# Altium PCB IOT_Speaker.PcbDoc (part 3 of 3)
Units mil, origin at the board's own origin, x right, y up, seen from the top; angles counter-clockwise.
Board outline 2439.53 x 2669.05 mil, 2 copper layers (Top Layer, Bottom Layer), stack 57 mil thick; 125 components, 73 nets, 403 pads, 148 vias.
Unrouted connection lines stored in the file: 20.
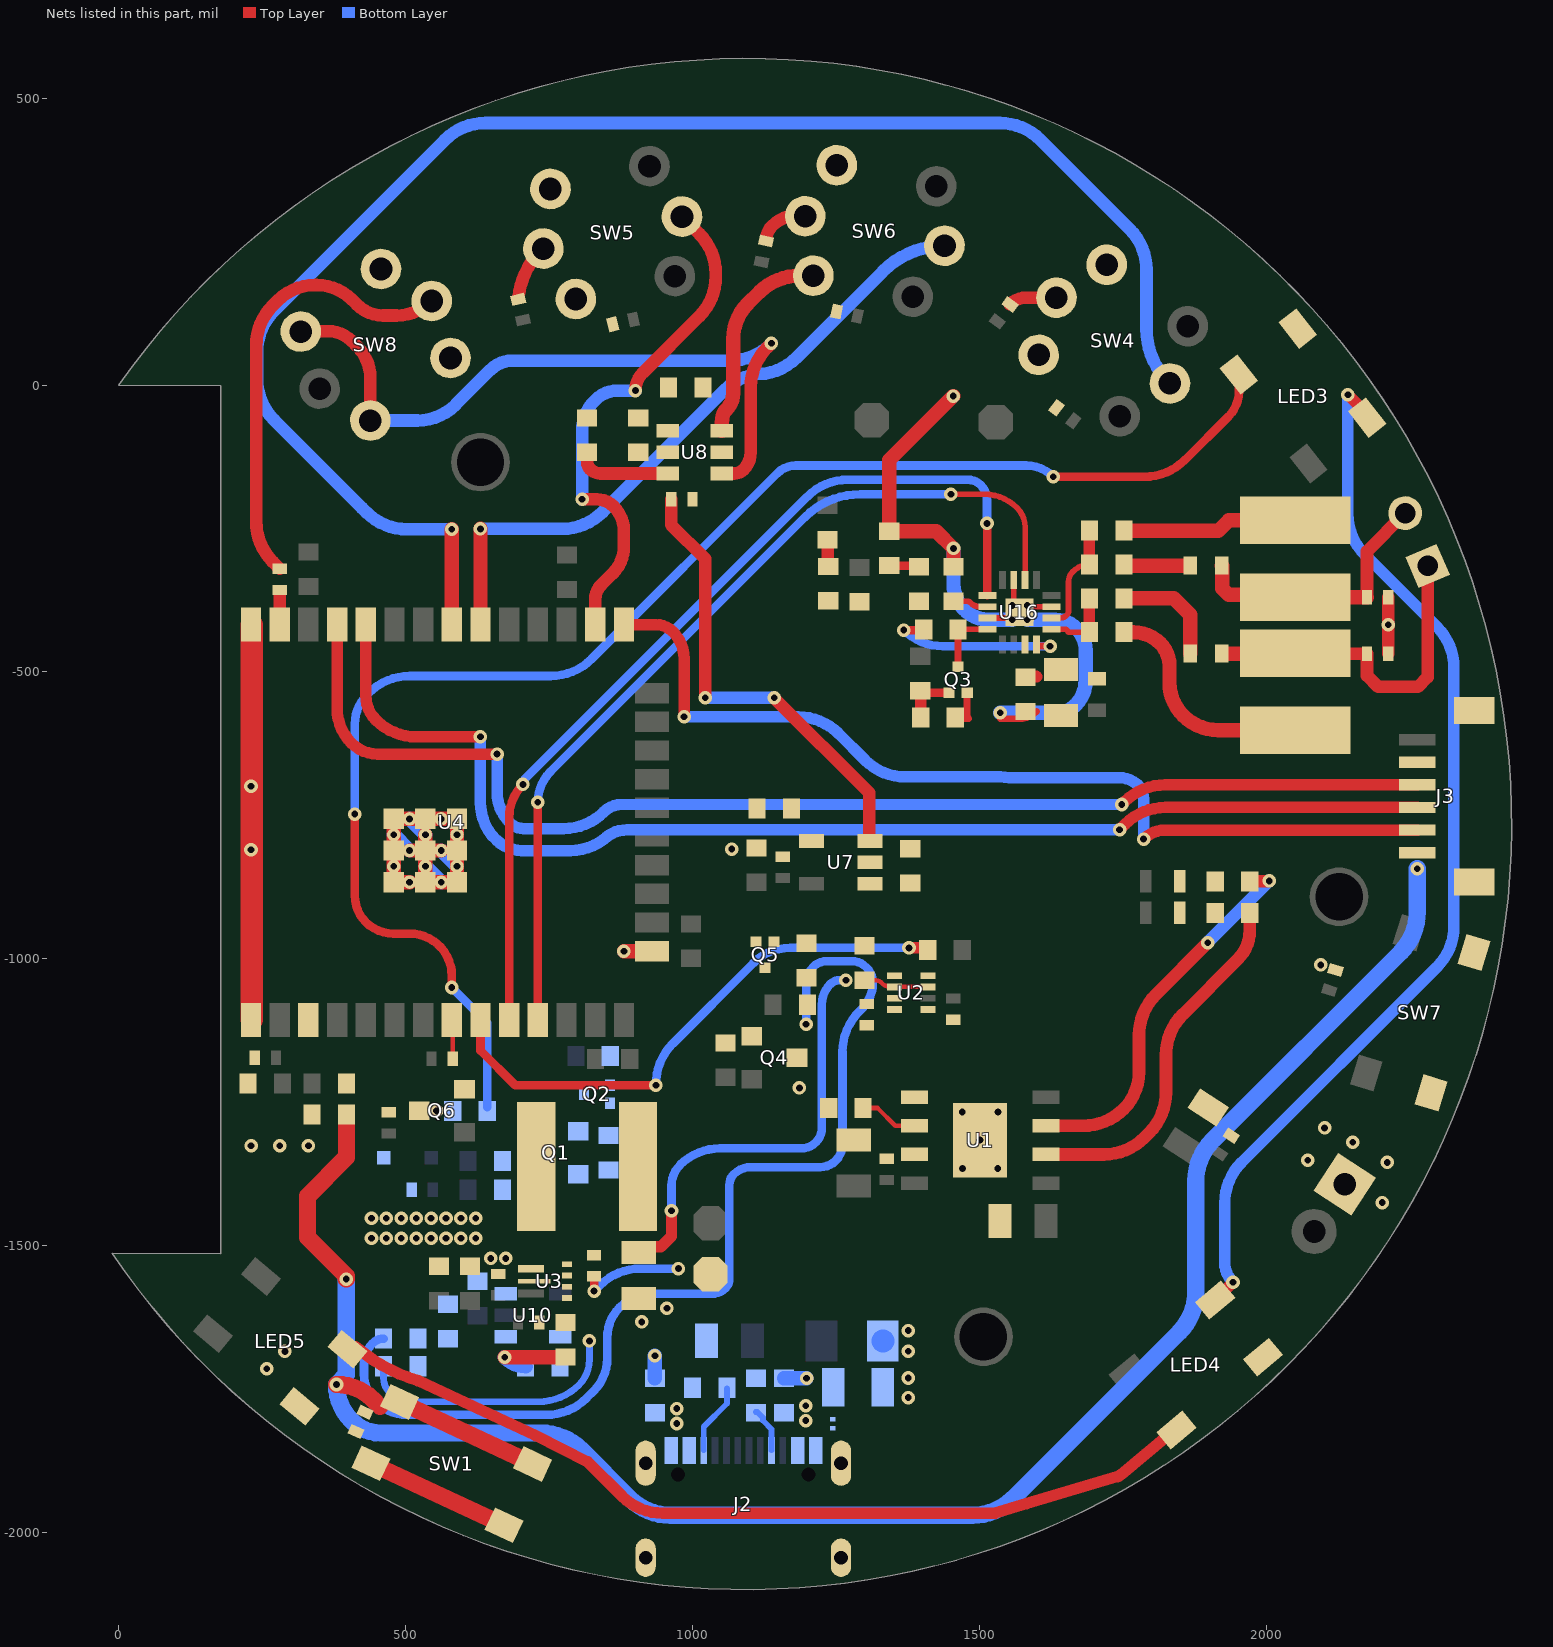
[diagram p2: the nets of this part, all layers, seen from the top]

## Via types
v1: diameter 23.62, hole 11.81, Top Layer to Bottom Layer, tented both sides, 129 vias
v2: diameter 23.62, hole 11.81, Top Layer to Bottom Layer, 19 vias

## Nets (pads, with @x,y where several pads share a name; then routed paths per layer and width w, separated by ;. In a path a pad name is that pad's centre, name@x,y a point inside that pad or via, vN(x,y) a via of type N, cw(c..) or ccw(c..) an arc to the next point about the centre after c; other vN are vias at no path point) (continued)
CHRG: R4.2 U1.7 | length 673.2
  Top Layer w22: U1.7@1615.79,-1291.05 1680.86,-1291.05 ccw(c1680.86,-1191.05) 1751.57,-1261.76 ccw(c1687.08,-1197.27) 1778.28,-1197.27 1778.28,-1133.14 cw(c1878.28,-1133.14) 1807.57,-1062.43 v1(1898,-972) ; R4.2@1969.74,-864.59 v1@2005.08,-864.59
  Bottom Layer w22: v1(1898,-972) 1898,-971.68 2005.08,-864.6 v1(2005.08,-864.28)
DATA_IN: U4.10 U16.1 | length 1631.5
  Top Layer w15: U4.10@680.31,-1106.5 680.31,-753.91 cw(c762.14,-753.91) 698.75,-702.16 cw(c762.14,-753.91) v1(704.28,-696.05) ; v1(1513.28,-241.05) 1513.53,-241.29 1513.53,-366.26 U16.1@1513.77,-366.51
  Bottom Layer w15: v1(704.28,-696.05) cw(c718.76,-696.05) 708.51,-685.81 1200.09,-194.24 cw(c1270.8,-264.95) 1270.8,-164.95 1480.31,-164.95 cw(c1480.31,-196.01) 1502.28,-174.05 cw(c1475.72,-200.6) 1513.28,-200.6 v1(1513.28,-241.05)
DETECTION: R6.2 U2.8 U4.9 | length 974.9
  Top Layer w15: U4.9@630.34,-1106.54 630.34,-1160.06 690.76,-1220.49 v1(936.11,-1220.49)
  Top Layer w20: v1(1377.28,-981.05) 1409.72,-981.05 R6.2@1410.03,-980.74
  Bottom Layer w15: v1(936.11,-1220.49) 936.11,-1218.73 cw(c1036.11,-1218.73) 965.4,-1148.01 1106.07,-1007.34 cw(c1170.31,-1071.58) 1170.31,-980.74 1376.97,-980.74 v1(1377.28,-981.05)
DIN: Q6.2 R26.2 U4.8 | length 80.1
  Top Layer w8: U4.8@580.34,-1106.53 581.84,-1108.03 R26.2@581.84,-1174.19
  Top Layer w15: U4.8@580.34,-1106.53 U4.8@580.34,-1094.72
DIN#: LED3.4 R28.2 | length 2638.4
  Top Layer w15: v1(411.28,-747.79) 411.28,-890.02 ccw(c476.36,-890.02) 430.34,-936.05 ccw(c478.63,-887.76) 478.63,-956.05 506.72,-956.05 cw(c506.72,-1029.67) 580.34,-1029.67 v1(580.34,-1050.05) ; v1(1628.83,-159.71) 1787.54,-159.71 ccw(c1787.54,-59.71) 1858.25,-130.42 1934.49,-54.18 ccw(c1891.03,-10.72) 1952.49,-10.72 LED3.4@1952.49,18.52
  Bottom Layer w15: v1(411.28,-747.79) 411.28,-590.75 cw(c482.98,-590.75) 432.28,-540.05 435.99,-536.34 cw(c506.7,-607.05) 506.7,-507.05 752.86,-507.05 ccw(c752.86,-407.05) 823.57,-477.76 1147.99,-153.34 cw(c1179.91,-185.26) 1179.91,-140.12 1581.52,-140.12 cw(c1581.52,-207.02) v1(1628.83,-159.71) ; v1(580.34,-1050.05) 642.07,-1111.78 R28.2@642.07,-1258.96
DOUT1: LED3.2 LED4.4 | length 1880.4
  Top Layer w20: LED4.4@1909.13,-1593.23 cw(c1838.53,-1664.05) 1909.24,-1593.34 LED4.4@1910.92,-1595.02 v1@1941.05,-1564.89 ; v1(2142.37,-16.87) 2171.78,-46.28 cw(c2161.45,-56.61) LED3.2@2176.06,-56.61 LED3.2@2180.68,-61.23
  Bottom Layer w20: v1(1942.04,-1563.84) cw(c1976.72,-1529.17) 1927.68,-1529.17 1927.68,-1425.72 cw(c2027.68,-1425.72) 1956.97,-1355.01 2297.96,-1014.01 ccw(c2227.25,-943.3) 2327.25,-943.3 2327.25,-492.41 ccw(c2227.25,-492.41) 2297.96,-421.7 2171.66,-295.39 cw(c2242.37,-224.68) 2142.37,-224.68 v1(2142.37,-16.87)
DOUT2: LED4.2 LED5.4 | length 1584
  Top Layer w20: LED5.4@414.58,-1691.68 LED5.4@398.43,-1680.55 412.35,-1676.4 441.59,-1698.08 441.76,-1698.22 ccw(c609.74,-1441.15) 521.01,-1735.14 522.3,-1735.74 726.64,-1831.03 817.28,-1877.05 877.27,-1937.04 ccw(c947.98,-1866.32) 947.98,-1966.32 1527.25,-1966.32 1582.11,-1949.94 1740.04,-1902.76 ccw(c1734.36,-1883.58) 1747.22,-1898.9 1789.9,-1863.09 1827.16,-1831.82 LED4.2@1843.64,-1821.08
EN: R13.2 R15.1 R16.1 | length 1829.1
  Bottom Layer w15: R13.2@461.16,-1662.26 ccw(c461.16,-1688.52) 442.59,-1669.95 ccw(c479.54,-1706.91) 427.28,-1706.91 427.28,-1723.79 ccw(c495.56,-1723.79) 447.28,-1772.08 ccw(c502.74,-1716.62) 502.74,-1795.05 744.62,-1795.05 ccw(c744.62,-1695.05) 815.33,-1765.76 827.78,-1753.31 ccw(c771.05,-1696.58) 851.28,-1696.58 851.28,-1660.38 cw(c926.39,-1660.38) 873.28,-1607.26 cw(c929.76,-1663.74) 929.76,-1583.87 1033.74,-1583.87 ccw(c1033.74,-1550.34) 1057.45,-1574.05 ccw(c1040.97,-1557.56) 1064.28,-1557.56 1064.28,-1393.81 cw(c1089.94,-1393.81) 1071.79,-1375.67 ; 1071.79,-1375.66 cw(c1102.26,-1406.13) 1071.85,-1375.61 cw(c1102.26,-1406.13) 1102.26,-1363.05 1222.72,-1363.05 ccw(c1222.72,-1325.49) 1249.28,-1352.05 ccw(c1220.31,-1323.08) 1261.28,-1323.08 1261.28,-1162.47 cw(c1361.28,-1162.47) 1290.57,-1091.76 1295.89,-1086.43 ccw(c1251.51,-1042.05) 1314.28,-1042.05 ccw(c1275.65,-1042.05) 1302.96,-1014.73 ccw(c1277.17,-1040.53) 1277.17,-1004.05 1234.42,-1004.05 ccw(c1234.42,-1038.19) 1210.28,-1014.05 ccw(c1240.23,-1043.99) 1197.87,-1043.99 v1(1197.87,-1114)
ENA: C14.2 C15.2 J3.6 R18.1 SW1.3 SW1.4 U4.3 | length 3543.6
  Top Layer w20: U4.3@330.34,-1106.53 U4.3@330.71,-1106.16
  Top Layer w30: v1@379.33,-1742.05 cw(c379.28,-1832.54) 443.27,-1768.55 455.14,-1780.43 ; v1(396.28,-1558.24) 396.28,-1553.05 329,-1485.77 329,-1413.66 396.5,-1346.16 C14.2@396.5,-1271.55 ; SW1.4@488.16,-1771.34 SW1.4@489.27,-1772.45 SW1.3@721.2,-1880.6
  Bottom Layer w30: v1(396.28,-1558.24) 396.28,-1725.05 v1(379.28,-1742.05) ccw(c467.99,-1742.05) 405.26,-1804.77 406.65,-1806.16 ccw(c456.12,-1756.64) 456.12,-1826.64 735.17,-1826.64 cw(c735.17,-1926.64) 805.88,-1855.93 890.71,-1940.76 ccw(c961.42,-1870.05) 961.42,-1970.05 1487.86,-1970.05 ccw(c1487.86,-1870.05) 1558.57,-1940.76 1847.99,-1651.34 ccw(c1777.28,-1580.63) 1877.28,-1580.63 1877.28,-1387.14 cw(c1977.28,-1387.14) 1906.57,-1316.43 2233.99,-989.01 ccw(c2163.28,-918.3) 2263.28,-918.3 v1(2263.28,-843.05)
ENABLE: C9.2 C16.2 C18.2 C74.2 C75.2 L1.1 R10.2 R14.2 U2.2 U2.7 U3.5 U3.7 U7.1 U7.3 U8.6 | length 2324.1
  Top Layer w8: C74.2@1299.61,-1037.4 1317.17,-1037.4 cw(c1317.17,-1057.12) 1331.11,-1043.17 ccw(c1345.37,-1028.92) 1345.37,-1049.08 U2.2@1352.14,-1049.08 U2.7@1410.41,-1049.08
  Top Layer w20: C16.2@906.87,-1512.64 C16.2@906.28,-1512.05 916.28,-1502.05 944.78,-1502.05 963.28,-1483.55 v1(963.28,-1439.05)
  Top Layer w22: R10.2@816.28,-117.05 816.28,-134.19 ccw(c833.35,-134.19) 821.28,-146.26 ccw(c840.08,-127.46) 840.08,-154.05 U8.6@956.63,-154.05 ; C9.2@962.78,-199.05 962.78,-243.55 1022.28,-303.05 v1(1022.28,-545.05) ; v1(1142.28,-545.05) 1308.28,-711.05 1308.28,-793.83 1308.65,-793.83 U7.3@1309.46,-794.65 ; C75.2@1379.46,-868.05 ccw(c1382.84,-864.66) C75.2@1382.84,-869.45
  Bottom Layer w12: R14.2@461.16,-1710.32 461.16,-1730.61 ccw(c495.72,-1730.61) 471.28,-1755.05 ccw(c512.39,-1713.94) 512.39,-1772.08 731.27,-1772.08 ccw(c731.27,-1672.08) 801.98,-1742.79 ccw(c757.81,-1698.61) 820.28,-1698.61 v1(820.28,-1666.05)
  Bottom Layer w15: v1(963.28,-1439.05) 963.28,-1395.51 cw(c1014.49,-1395.51) 978.28,-1359.3 cw(c1047.68,-1428.69) 1047.68,-1330.55 1189.33,-1330.55 ccw(c1189.33,-1294.56) 1214.78,-1320.01 ccw(c1189.33,-1294.56) 1225.32,-1294.56 1225.32,-1079.97 cw(c1276.2,-1079.97) 1225.33,-1079.35 cw(c1276.2,-1079.97) 1240.23,-1043.99 cw(c1256.15,-1059.92) 1256.15,-1037.4 v1(1267.28,-1037.4)
  Bottom Layer w22: v1(1022.28,-545.05) v1(1142.28,-545.05)
GAIN: SB1.1 SB3.1 SB12.1 SB13.1 U16.2 | length 71.3
  Top Layer w10: SB3.1@1454.88,-376.65 1478.48,-376.65 cw(c1478.48,-384.84) 1484.28,-379.05 1485.4,-380.17 ccw(c1499.95,-365.61) 1499.95,-386.2 U16.2@1513.77,-386.2
  Top Layer w15: SB13.1@1230.88,-377.65 cw(c1233.29,-380.06) SB13.1@1233.29,-376.65
  Top Layer w20: SB13.1@1236.5,-376.02 ccw(c1240.43,-372.09) SB13.1@1240.43,-377.65 ; SB12.1@1290.88,-377.65 cw(c1293.29,-380.06) SB12.1@1293.29,-376.65
GND: C1.1 C2.1 C3.1 C4.2 C5.1 C6.1 C7.1 C8.1 C9.1 C10.1 C11.1 C12.2 C13.1 C14.1 C15.1 C16.1 C17.1 C18.1 C19.2 C20.1 C21.2 C22.2 C23.1 C24.2 C25.1 C26.1 C74.1 C75.1 C76.1 C77.1 C78.1 C81.1 C82.1 C83.1 C84.1 C102.1 C103.1 D1.2 D2.1 J1.1 J2.A1/B12 J2.B1/A12 J2.S1 J2.S2 J2.S3 J2.S4 J3.2 J3.MP1 J3.MP2 LED3.3 LED4.3 LED5.3 P3.1 Q2.2 Q3.2 Q5.2 R1.1 R2.1 R5.1 R8.1 R12.2 R54.1 R66.2 SB3.2 SW1.1 SW1.2 SW4.3 SW4.4 SW5.3 SW5.4 SW6.3 SW6.4 SW7.3 SW7.4 SW8.1 SW8.2 U1.1 U1.3 U1.9 U2.1 U2.4 U2.5 U3.1 U3.6 U4.1 U4.15 U4.38 U4.39 U4.39_16 U4.40 U4.41 U4.42 U4.43 U4.44 U4.45 U4.46 U4.47 U7.2 U8.2 U8.3 U10.3 U16.3 U16.11 U16.15 U16.17 | length 3842.6
  Top Layer w8: v1@828.28,-1579.2 v1(828.41,-1579.33)
  Top Layer w10: U16.3@1513.77,-405.88 U16.17@1557.28,-405.88 ; U16.17@1560.03,-372.28 U16.15@1560.03,-339.94 ; U16.17@1593.64,-386.2 U16.11@1625.98,-386.2
  Top Layer w12: R12.2@1457.88,-581.65 1481.28,-581.65 cw(c1487.68,-575.24) 1478.62,-575.24 Q3.2@1478.62,-536.28 ; v1@1536.28,-581.65 1568.49,-581.65 ccw(c1568.49,-537.26) 1599.88,-568.65 ; U16.17@1555.28,-384.05 cw(c1555.28,-390.34) 1559.72,-385.88 U16.17@1569.88,-396.04
  Top Layer w15: v1@828.28,-1579.2 C18.1@828.28,-1553.55
  Top Layer w22: C10.1@2212.68,-468.05 2212.68,-419.25 2213.86,-418.08 2213.86,-417.2 2212.68,-416.02 C11.1@2212.68,-369.65
  Top Layer w25: U4.39_16@506.72,-866.38 U4.39@479.16,-866.38 U4.40@479.16,-811.26 U4.41@479.16,-756.14 U4.44@534.28,-756.14 U4.39_16@561.84,-756.14 U4.47@589.4,-756.14 U4.39_16@589.4,-783.7 U4.46@589.4,-811.26 U4.39_16@589.4,-838.82 U4.45@589.4,-866.38 U4.39_16@561.84,-866.38 U4.42@534.28,-866.38 U4.39_16@534.28,-838.82 U4.43@534.28,-811.26 ; U4.39_16@506.72,-811.26 U4.43@534.28,-811.26 ; U4.39_16@534.28,-783.7 U4.43@534.28,-811.26 ; U4.39_16@561.84,-811.26 U4.43@534.28,-811.26 ; v1(672.78,-1694.72) R8.1@777.6,-1694.72 ; v1(880.34,-986.85) U4.15@929.55,-986.85 ; U8.3@1051.12,-79.24 1051.12,-64.51 cw(c1076.12,-64.58) 1051.49,-60.3 ccw(c1033.28,-57.05) 1051.74,-58.27 cw(c1076.67,-60.07) 1056.28,-45.61 cw(c1079.02,-61.78) 1059.29,-42.05 ccw(c1031.5,-14.25) 1070.81,-14.25 1070.81,80.49 cw(c1158.12,80.49) 1096.38,142.23 1115.7,161.55 cw(c1186.41,90.84) 1186.41,190.84 SW6.4@1210.69,190.84 ; v1(1454.28,-19.05) 1342.88,-130.45 R66.2@1342.88,-254.65 1424.88,-254.65 v1(1454.88,-284.65) SB3.2@1454.88,-316.65
  Top Layer w30: SW1.1@439.36,-1879.49 SW1.2@671.29,-1987.64
  Top Layer w39.37: U4.1@231.28,-1106.53 U4.38@231.28,-417.56
  Bottom Layer w15: v1(828.41,-1579.33) 838.4,-1569.34 cw(c909.11,-1640.05) 909.11,-1540.05 v1(975.28,-1540.05)
  Bottom Layer w25: U4.39_16@479.16,-783.7 U4.39_16@506.72,-811.26 ; U4.39_16@506.72,-756.14 U4.39_16@534.28,-783.7 ; U4.39_16@534.28,-838.82 U4.39_16@561.84,-866.38 ; U4.39_16@561.84,-811.26 U4.39_16@589.4,-838.82 ; v1(672.78,-1694.72) 673.79,-1695.74 ccw(c709,-1660.52) C82.1@709,-1710.32 ; C4.2@934.28,-1731.32 v1(934.28,-1692.05) ; C12.2@1159.28,-1731.32 v1(1198.66,-1731.32) ; v1(1454.88,-284.65) 1454.88,-346.46 ccw(c1517.53,-346.46) 1514.73,-409.05 v1(1557.28,-409.05) ; v1(1536.28,-571.05) 1635.89,-571.05 ccw(c1635.89,-526.66) 1667.28,-558.05 ccw(c1623.82,-514.59) 1685.28,-514.59 1685.28,-461.89 ccw(c1632.55,-461.89) 1669.83,-424.6 ccw(c1632.28,-462.16) 1632.28,-409.05 v1(1583.28,-409.05)
  other v1: 257.6,-1714.61 289.46,-1684.45 911.28,-1633.05 955.28,-1609.18 2202.28,-1425.05 1470.55,-1365.39 1531.99,-1365.39 2210.8,-1354.88 2072.56,-1351.15 230.34,-1326.05 280.34,-1326.05 330.34,-1326.05 2150.8,-1319.88 1501.28,-1316.05 2101.8,-1294.88 1470.28,-1267.05 1532.28,-1267.05 2095.19,-1010.75 230.28,-810.05 1068.17,-808.81 230.28,-699.05 2212.86,-417.64 1557.28,-384.05 1583.28,-384.05
  other v2: 648.16,-1522.29 674.16,-1522.29 440.31,-1487.29 466.16,-1487.29 492.16,-1487.29 518.16,-1487.29 544.16,-1487.29 570.16,-1487.29 596.16,-1487.29 622.16,-1487.29 440.31,-1452.29 466.16,-1452.29 492.16,-1452.29 518.16,-1452.29 544.16,-1452.29 570.16,-1452.29 596.16,-1452.29 622.16,-1452.29
IO0: J3.5 U4.25 | length 1652.1
  Top Layer w20: U4.25@880.34,-417.56 935.83,-417.56 cw(c935.83,-460.01) 965.85,-429.99 cw(c918.93,-476.91) 985.28,-476.91 v1(985.28,-578.05) ; v1(1786.15,-791.39) cw(c1824.45,-829.68) 1786.3,-791.25 cw(c1824.45,-829.68) 1824.45,-775.53 J3.5@2263.28,-775.53
  Bottom Layer w20: v1(985.28,-578.05) 1183.68,-578.05 cw(c1183.68,-678.05) 1254.39,-607.34 1300.81,-653.76 ccw(c1371.52,-583.05) 1371.52,-683.05 1536.57,-683.05 cw(c1536.57,-783.05) 1552.44,-684.31 1743.34,-684.31 cw(c1743.34,-733.24) 1773.36,-694.61 cw(c1743.34,-733.24) 1777.93,-698.64 ; 1776.06,-696.87 cw(c1751.71,-721.23) 1786.15,-721.23 v1(1786.15,-791.39)
LED1: SW4.5 U4.31 | length 2739.3
  Top Layer w25: U4.31@580.1,-417.31 v1(580.1,-251.24)
  Bottom Layer w22: v1(580.1,-251.24) 502.36,-251.24 cw(c502.36,-151.24) 431.65,-221.95 423.78,-214.08 270.29,-60.58 cw(c341,10.13) 241,10.13 241,58.85 cw(c341,58.85) 270.29,129.56 568.39,427.66 cw(c639.1,356.95) 639.1,456.95 1535.46,456.95 cw(c1535.46,356.95) 1606.17,427.66 1761.99,271.85 cw(c1691.28,201.13) 1791.28,201.13 1791.28,98.59 ; 1791.28,98.14 ccw(c1922.32,98.11) 1829.74,5.36 SW4.5@1832.16,2.95
LED2: SW6.5 U4.30 | length 1161.3
  Top Layer w25: v1(630.28,-250.55) 630.28,-417.5 U4.30@630.34,-417.56
  Bottom Layer w22: v1(630.28,-250.55) 772.3,-250.55 ccw(c772.3,-150.55) 843.01,-221.26 1055.12,-9.15 cw(c1125.83,-79.86) 1110.45,18.95 cw(c1125.83,-79.86) 1125.83,20.14 1126.23,20.14 ccw(c1110.86,118.95) 1181.57,48.24 1331.73,198.4 cw(c1439.1,91.14) SW6.5@1439.1,242.91
LED3: SW5.5 U4.26 | length 914.8
  Top Layer w22: v1(807.4,-199.05) 832.45,-199.05 cw(c832.45,-241.72) 862.62,-211.55 cw(c819.85,-254.32) 880.34,-254.32 880.34,-281.05 cw(c813.43,-281.05) 874.56,-308.25 cw(c813.43,-281.05) 860.74,-328.36 840.43,-348.68 ccw(c864.8,-373.04) 830.34,-373.04 U4.26@830.34,-417.56 ; v1(900.31,-9.45) cw(c944.06,-9.45) 913.12,21.49 1011.99,120.36 ccw(c943.46,188.89) 1040.37,188.89 1040.37,194.92 ccw(c943.46,194.92) 1011.99,263.45 SW5.5@981.55,293.88
  Bottom Layer w22: v1(807.4,-199.05) 807.4,-81.17 cw(c885.36,-81.17) 830.24,-26.05 cw(c870.31,-66.12) 870.31,-9.45 v1(900.31,-9.45)
LED4: R33.2 U4.37 | length 56.4
  Top Layer w22: U4.37@280.31,-417.53 R33.2@280.31,-361.22
LRCLK: U4.11 U16.14 | length 1582.7
  Top Layer w10: v1(1450.37,-190.26) 1508.45,-190.26 cw(c1508.45,-271.56) 1565.94,-214.07 cw(c1532.67,-247.34) 1579.72,-247.34 U16.14@1579.72,-339.94
  Top Layer w15: U4.11@730.31,-1106.5 v1(730.28,-727.05)
  Bottom Layer w15: v1(730.28,-727.05) cw(c805.73,-727.05) 752.38,-673.69 1196.05,-230.02 ; 1196.05,-230.02 cw(c1292.04,-326) 1292.04,-190.26 v1(1450.37,-190.26)
NetC10_2: C10.2 FB2.2 J9.1 L2.2 | length 606.3
  Top Layer w22: L2.2@2050.68,-467.65 2051.08,-468.05 C10.2@2175.68,-468.05 2175.68,-506.45 2195.28,-526.05 2264.29,-526.05 2281.35,-508.98 J9.1@2281.35,-315.1
  Top Layer w25: FB2.2@1922.84,-468.05 2050.28,-468.05 L2.2@2050.68,-467.65
NetC11_2: C11.2 FB3.2 J9.2 L3.2 | length 472.9
  Top Layer w22: C11.2@2175.68,-369.65 2175.68,-289.65 J9.2@2242.28,-223.05
  Top Layer w25: FB3.2@1922.68,-314.65 1923.37,-315.33 1923.37,-354.52 1934.49,-365.65 2046.68,-365.65 L3.2@2050.68,-369.65 C11.2@2175.68,-369.65
NetC76_2: C76.2 U7.4
NetC82_2: C82.2 U10.5
NetC84_2: C84.2 R13.1 R14.1 U10.1
NetC102_2: C102.2 C103.2 FB1.2 R65.2 U16.7 U16.8 | length 323.6
  Top Layer w12: R65.2@1401.48,-427.05 R65.2@1402.88,-425.65 ; U16.8@1599.4,-452.14 ccw(c1606.42,-445.13) 1606.42,-455.05 v1(1623.28,-455.05)
  Top Layer w15: v1(1368.28,-427.05) R65.2@1401.48,-427.05
  Top Layer w20: 1599.4,-507.5 ccw(c1601.02,-507.5) 1599.88,-508.65
  Bottom Layer w15: v1(1368.28,-427.05) ccw(c1435.88,-359.45) 1435.88,-455.05 v1(1623.28,-455.05)
NetF1_2: F1.2 FB7.1 | length 0.3
  Bottom Layer w40: FB7.1@1331.59,-1666.05 FB7.1@1331.82,-1666.28
  other v1: 1376,-1764.8 1376,-1730.76 1376,-1684.04 1376,-1648
NetFB2_1: FB2.1 SB5.2 | length 195.3
  Top Layer w25: SB5.2@1751.88,-371.65 1838.84,-371.65 1867.56,-400.36 1867.56,-467.89 FB2.1@1867.72,-468.05
NetFB3_1: FB3.1 SB7.2 | length 111.7
  Top Layer w25: SB7.2@1751.88,-314.65 FB3.1@1863.62,-314.65
NetJ2_A5: J2.A5 R1.2 | length 79.7
  Bottom Layer w10: R1.2@1110.28,-1790.05 1112.78,-1790.05 1122.78,-1800.05 1122.78,-1805.05 1137.71,-1819.98 J2.A5@1137.71,-1856.92
NetJ2_B5: J2.B5 R2.2 | length 124.7
  Bottom Layer w10: J2.B5@1019.6,-1856.92 1019.6,-1815.72 1060.1,-1775.22 R2.2@1060.1,-1749.05
NetL1_2: L1.2 U3.2
NetL2_1: L2.1 SB6.2 | length 407.5
  Top Layer w25: SB6.2@1751.88,-430.65 1768.44,-430.65 cw(c1768.44,-496.89) 1815.28,-450.05 cw(c1776.64,-488.69) 1831.28,-488.69 1831.28,-518.19 ccw(c1913.1,-518.19) 1855.25,-576.05 ccw(c1916.7,-514.59) 1916.7,-601.5 L2.1@2050.68,-601.5
NetL3_1: L3.1 SB8.2 | length 306.3
  Top Layer w25: SB8.2@1751.88,-253.65 1916.63,-253.65 1934.49,-235.79 L3.1@2050.68,-235.79 ; SB8.2@1754.38,-253.61 SB8.2@1754.49,-253.61
NetLED1_2: LED1.2 R3.1
NetLED2_2: LED2.2 R4.1
NetQ1_1: Q1.1 Q2.3 R55.2
NetQ2_1: Q2.1 R56.2
NetQ3_1: Q3.1 R11.1 R12.1 | length 88.7
  Top Layer w15: R11.1@1405.66,-536.28 Q3.1@1447.13,-536.28
  Top Layer w20: R11.1@1396.89,-534.66 cw(c1394.46,-537.06) R11.1@1397.88,-537.06 ; R12.1@1397.88,-579.65 R11.1@1397.88,-535.06
NetQ4_1: Q4.1 Q5.3 R17.1
NetQ5_1: Q5.1 R16.2
NetQ6_3: Q6.3 R27.2 R28.1 | length 30.4
  Top Layer w8: Q6.3@523.49,-1265.04 v1(553.84,-1265.04)
NetR5_2: R5.2 U1.2 | length 102.3
  Top Layer w8: R5.2@1297.28,-1260.05 1322.35,-1260.05 1353.35,-1291.05 U1.2@1386.77,-1291.05
NetR7_1: R7.1 R8.2 U3.4
NetR10_1: R10.1 SB2.2 SB4.2
NetR23_1: R23.1 SW4.6 | length 84.1
  Top Layer w22: R23.1@1553.44,140.71 cw(c1582.05,112.09) 1582.05,152.56 SW4.6@1634.33,152.56
NetR24_1: R24.1 SW6.6 | length 88.2
  Top Layer w22: R24.1@1128.19,255.25 cw(c1166.31,251.14) 1138.95,278 cw(c1182.44,234.85) SW6.6@1196.49,294.48
NetR25_1: R25.1 SW5.6 | length 99.7
  Top Layer w22: R25.1@696.64,153.48 cw(c828.93,139.35) 708.06,194.94 cw(c842.45,133.13) 737.8,237.67 SW5.6@739.88,238.09 SW5.6@737.85,237.73
NetR33_1: R33.1 SW8.5 | length 789.4
  Top Layer w22: R33.1@280.28,-320.05 268.57,-308.34 cw(c339.28,-237.63) 239.28,-237.63 239.28,68.53 cw(c339.28,68.53) 268.57,139.24 276.42,147.1 cw(c342.66,80.86) 342.66,174.53 344.52,174.53 cw(c344.52,87.2) 406.28,148.95 414.7,140.53 ccw(c461.13,186.96) 461.13,121.3 483.99,121.3 ccw(c483.99,208.05) SW8.5@545.33,146.71
NetR66_1: R66.1 SB1.2 | length 52.5
  Top Layer w15: R66.1@1342.88,-314.65 1390.05,-314.65 cw(c1390.05,-321.47) SB1.2@1394.88,-316.65
NetR67_1: R67.1 SB13.2 | length 49.5
  Top Layer w15: SB13.2@1229.88,-315.23 ccw(c1233.29,-315.23) SB13.2@1230.88,-317.65
  Top Layer w22: R67.1@1235.5,-269.42 1235.5,-313.6 ccw(c1238.92,-313.6) SB13.2@1236.5,-316.02
NetSB2_1: SB2.1 U8.4
NetSB4_1: SB4.1 U8.5
NetSW8_3: SW8.3 SW8.4 U8.1 | length 1272.7
  Top Layer w22: SW8.3@316.62,94.2 364.26,94.2 cw(c364.26,34.98) 406.14,76.85 415.14,67.85 cw(c358.99,11.71) 430.89,45.41 cw(c358.99,11.71) 438.39,11.71 SW8.4@438.39,-61.74 ; SW8.3@317.2,93.38 318.24,93.38 cw(c318.24,-6.62) SW8.3@329.41,92.76 ; U8.1@1051.12,-154.05 1072.13,-154.05 ccw(c1072.13,-130.22) 1088.98,-147.07 ccw(c1059.29,-117.38) 1101.28,-117.38 1101.28,-4.6 cw(c1201.28,-4.6) 1130.57,66.11 v1(1137.4,72.95)
  Bottom Layer w22: SW8.4@438.39,-61.74 520.03,-61.74 ccw(c520.03,32.97) 587,-34 648.01,27.01 cw(c685.99,-10.96) 685.99,42.74 1065.78,42.74 ccw(c1065.78,142.74) 1136.49,72.03 v1(1137.4,72.95)
OUTN: SB7.1 SB8.1 U16.10 | length 197.8
  Top Layer w10: U16.10@1625.98,-405.88 1640.61,-405.88 ccw(c1640.61,-389.37) 1652.28,-401.05 ccw(c1645.04,-393.8) 1655.28,-393.8 1655.28,-342.84 ; 1655.28,-342.8 cw(c1679.48,-342.78) 1662.37,-325.67 1663.73,-324.3 cw(c1691.88,-352.45) 1681.88,-313.92 SB7.1@1691.88,-312.65
  Top Layer w20: SB7.1@1691.88,-312.65 SB8.1@1691.88,-253.65
OUTP: SB5.1 SB6.1 U16.9 | length 130
  Top Layer w10: U16.9@1625.98,-425.57 1650.8,-425.57 1655.88,-430.65 SB6.1@1691.88,-430.65
  Top Layer w20: SB6.1@1691.88,-430.65 1691.88,-371.98 SB5.1@1691.88,-368.65
RXD: J3.4 U4.34 | length 2179.2
  Top Layer w20: U4.34@430.34,-417.56 430.34,-540.99 ccw(c490.83,-540.99) 448.06,-583.76 ccw(c518.77,-513.05) 518.77,-613.05 v1(630.28,-613.05) ; v1(1744.28,-775.05) 1753.88,-765.45 cw(c1824.59,-836.16) 1824.59,-736.16 J3.4@2263.28,-736.16
  Bottom Layer w20: v1(630.28,-613.05) 630.28,-727.05 ccw(c725.55,-727.05) 648.95,-783.7 658.06,-792.8 ; 658.07,-792.82 ccw(c702.61,-748.25) 702.61,-811.26 786.68,-811.26 ccw(c786.68,-712.34) 845.57,-791.82 cw(c886.07,-832.32) 853.82,-784.99 cw(c886.07,-832.32) 871.64,-776.89 cw(c886.07,-832.32) 886.07,-775.05 v1(1744.28,-775.05)
SD_MODE: Q3.3 R65.1 U16.4 | length 118.3
  Top Layer w10: R65.1@1462.96,-425.57 U16.4@1513.77,-425.57
  Top Layer w12: Q3.3@1462.88,-493.01 R65.1@1462.88,-425.65 R65.1@1462.96,-425.57
STDBY: R3.2 U1.6 | length 635.8
  Top Layer w22.01: U1.6@1615.79,-1341.05 1716.86,-1341.05 ccw(c1716.86,-1241.05) 1787.57,-1311.76 1795.99,-1303.34 ccw(c1725.28,-1232.63) 1825.28,-1232.63 1825.28,-1167.47 cw(c1925.28,-1167.47) 1854.57,-1096.76 1950.62,-1000.7 ccw(c1900.75,-950.83) 1971.28,-950.83 R3.2@1971.28,-920.05
TXD: J3.3 U4.35 | length 2203.8
  Top Layer w20: U4.35@380.34,-417.56 380.34,-563.84 ccw(c465.48,-563.84) 405.28,-624.05 ccw(c451.15,-578.18) 451.15,-643.05 v1(659.28,-643.05) ; v1(1748.28,-731.05) 1753.25,-726.08 cw(c1823.96,-796.79) 1823.96,-696.79 J3.3@2263.28,-696.79
  Bottom Layer w20: v1(659.28,-643.05) 659.28,-709.31 ccw(c735.44,-709.31) 681.59,-763.17 ccw(c705.44,-739.32) 705.44,-773.05 774.86,-773.05 ccw(c774.86,-673.05) 845.57,-743.76 cw(c876.25,-774.44) 876.25,-731.05 v1(1748.28,-731.05)
V_MON: Q1.3 R9.2
VBAT: C8.2 Q1.2 Q4.3 R55.1 U2.3
  other v2: 1186.28,-1225.05
VUSB: C4.1 C12.1 D1.1 F1.1 J2.A4/B9 J2.B4/A9
  other v1: 972.28,-1810.05 1197.28,-1805.05 972.28,-1784.05 1197.28,-1779.05
pads on no net: J2.A6 J2.A7 J2.A8 J2.B6 J2.B7 J2.B8 J2.MH LED5.2 U4.4 U4.5 U4.6 U4.14 U4.17 U4.18 U4.19 U4.20 U4.21 U4.22 U4.23 U4.24 U4.29 U4.32 U10.4 U16.5 U16.6 U16.12 U16.13

## Polygon pours and split planes (outlines as drawn)
GND on Bottom Layer "NONET_L02_P-001" (solid, remove dead copper, pour order 0): 29.64,-1529.9 ccw(c1092.99,-764.8) 40.81,15.6 190.34,15.6 188.63,-1530.12
GND on Top Layer "NONET_L02_P-001" (solid, remove dead copper, pour order 1): 29.64,-1529.9 ccw(c1092.99,-764.8) 40.81,15.6 190.34,15.6 188.63,-1530.12

## Other copper
Top Layer:
  rectangle net 3.3V: 462.62,-1227.64 555.23,-1161.69
  rectangle net 5V_BOOST: 457.98,-1317.18 482.98,-1291.68
  rectangle net NetQ6_3: 457.98,-1281.18 564.07,-1243.78
  rectangle net DIN: 572.84,-1243.78 631.44,-1206.69
  rectangle net DIN: 572.84,-1243.78 601.23,-1161.69
  region net GAIN: 1473.28,-360.5 1215.92,-360.5 1215.92,-396.05 1473.28,-396.05
  region net BATT: 1851.56,-1275.4 1738.45,-1410.21 1819.96,-1478.61 1933.08,-1343.8
  rectangle net 5V_BOOST: 1214.5,-232.05 1310.88,-196.05
  rectangle net 5V_BOOST: 1271.22,-334.05 1310.88,-197.92
  rectangle net 3.3V: 2166.68,-636.84 2294.77,-595.5
  rectangle net ENA: 2231.78,-857.02 2294.77,-805.05
  region net NetF1_2: 1401,-1781.04 1401,-1628.64 1347.84,-1628.64 1347.84,-1781.04
  region net 5V: 1808.57,-845.36 1768,-845.36 1768,-988 1808.57,-988
  region net BUTTON_4: 2121.87,-1077.92 2130.86,-1048.52 2066.99,-1028.99 2058,-1058.39
  rectangle net BUTTON_3: 730.34,-373.05 799.78,-341.05
  rectangle net 3.3V: 759.28,-320.05 839.08,-272
  rectangle net 3.3V: 307,-311.05 380.34,-264
  region net 3.3V: 686.25,118.31 696.82,72.54 731.15,80.46 720.58,126.23
  rectangle net GND: 1252.28,-1357.55 1410.39,-1316.05
  region net BATT: 1852.9,-1273.93 1817.26,-1328.8 2039.97,-1473.43 2075.61,-1418.56
  region net BATT: 1991.01,-1363.84 1912.56,-1484.66 2102.05,-1607.71 2180.5,-1486.9
  rectangle net GND: 1031.44,-128.46 1070.81,-67.43
  region net BUTTON_4: 2227.92,-1100.58 2233.28,-1083.05 2100.55,-1042.47 2095.19,-1060
  region net BUTTON_4: 2278.64,-934.6 2236.56,-921.73 2145.63,-1219.17 2187.71,-1232.03
  rectangle net NetSB2_1: 988.28,-91.05 1008.78,13.45
  rectangle net NetSB2_1: 988.28,-57.05 1033.28,13.45
  rectangle net NetSB2_1: 936.95,-91.05 1008.78,-67.43
  rectangle net NetR10_1: 798.78,-57.05 973.28,-42.05
  rectangle net NetR10_1: 943.28,-57.05 973.28,13.45
  rectangle net NetR10_1: 798.78,-72.05 922.78,-42.05
  rectangle net NetSB4_1: 887.78,-132.05 976.32,-102.05
  region net DOUT2: 360.15,-1674.13 427.4,-1730.55 460.48,-1691.13 393.23,-1634.71
  rectangle net GND: 876.28,-1645.05 972.28,-1571.05
  rectangle net ENABLE: 807.17,-1625.31 868.28,-1598.05
  rectangle net ENABLE: 807.17,-1679.05 833.25,-1598.16
  rectangle net ENABLE: 798.95,-1611.22 833.25,-1598.16
  rectangle net ENABLE: 798.95,-1611.22 809.14,-1566.81
  rectangle net ENABLE: 772.42,-1576.65 809.14,-1566.81
  rectangle net ENABLE: 855.28,-1625.31 868.66,-1507.55
  rectangle net ENABLE: 871.4,-1532.05 938.33,-1249.84
  rectangle net NetL1_2: 694.23,-1516.06 761.43,-1249.84
  rectangle net NetL1_2: 749.78,-1565.83 761.43,-1249.84
  rectangle net GND: 210.28,-1347.05 351.5,-1254.05
  rectangle net GND: 210.28,-1347.05 248.09,-1077.01
  region net GND: 278.48,-1777.57 414.75,-1891.91 441.23,-1860.36 304.95,-1746.02
  rectangle net ENABLE: 772.42,-1537.28 804.09,-1507.55
  rectangle net ENABLE: 772.42,-1525.55 936.28,-1507.55
  rectangle net GND: 815.78,-1562.55 840.78,-1544.55
  rectangle net GND: 423.28,-1558.55 686.78,-1441.15
  rectangle net GND: 1048.28,-832.05 1127.28,-720.55
  rectangle net GND: 1094.18,-831.05 1169.78,-791.65
  rectangle net GND: 772.42,-1556.97 840.78,-1547.13
  rectangle net BATT: 1078.08,-1553.05 1121.22,-1186.05
  rectangle net GND: 523.78,-1547.13 740.92,-1533.35
  region net GND: 375.86,-1873.78 455.18,-1910.77 485.35,-1846.08 406.02,-1809.09
  region net ENA: 412.87,-1794.42 492.19,-1831.41 523.4,-1764.47 444.08,-1727.48
  rectangle net 5V_BOOST: 501.78,-1596.05 740.92,-1576.65
  rectangle net 5V_BOOST: 501.78,-1646.79 704.78,-1576.65
  rectangle net NetL1_2: 695.65,-1565.83 761.43,-1557.95
  rectangle net 5V: 1441.66,-1078.16 1639.41,-1041.05
  rectangle net ENABLE: 1255.28,-881.26 1331.11,-857.64
  rectangle net ENABLE: 1246.83,-1052.4 1275.74,-782.62
  rectangle net ENABLE: 1255.28,-806.46 1331.11,-782.83
  rectangle net DETECTION: 1395.03,-1035.3 1423.6,-963.24
  rectangle net NetC76_2: 1157.28,-755.55 1228.75,-720.55
  rectangle net NetC76_2: 1185.28,-806.46 1228.75,-720.55
  rectangle net ENABLE: 1287.81,-883.05 1396.96,-853.05
  rectangle net 3.3V: 262.62,-1235.05 351.5,-1200.05
  rectangle net 3.3V: 262.62,-1235.05 300.28,-959.05
  rectangle net ENA: 312.62,-1181.42 411.5,-1147.61
  rectangle net ENA: 312.62,-1172.55 348.06,-1077.01
  rectangle net ENA: 381.5,-1289.05 411.5,-1147.61
  rectangle net NetR7_1: 723.78,-1651.79 795.78,-1616.79
  rectangle net NetR7_1: 763.78,-1651.79 790.27,-1586.5
  rectangle net NetQ4_1: 1039.78,-1166.42 1074.78,-1006.83
  rectangle net NetQ4_1: 1048.28,-1035.38 1139.7,-1006.83
  rectangle net VBAT: 1235.75,-1174.05 1267.28,-1062.86
  rectangle net NetQ4_1: 1039.78,-1167.05 1122.28,-1115.05
  rectangle net EN: 1180.63,-1128.59 1215.78,-1018.05
  rectangle net 3.3V: 1048.28,-886.85 1228.75,-848.87
  rectangle net NetQ5_1: 1132.18,-988.05 1215.78,-947.05
  rectangle net VBAT: 1162.28,-1174.05 1267.28,-1145.26
  rectangle net VBAT: 1247.19,-1087.79 1322.15,-1062.86
  rectangle net VBAT: 1291,-1074.67 1365.33,-1062.86
  rectangle net ENABLE: 1255.28,-1052.4 1294.43,-1022.4
  rectangle net 5V: 1397.22,-1074.67 1466.66,-1062.86
  rectangle net 5V: 1171.28,-1480.02 1410.39,-1376.05
  rectangle net VUSB: 918.28,-1820.05 1211.28,-1768.8
  rectangle net BATT: 1592.16,-1553.05 1644.28,-1379.24
  rectangle net BATT: 1078.08,-1553.05 1644.28,-1499.05
  rectangle net 5V: 1501.28,-1216.05 1639.41,-1041.05
  rectangle net 5V: 1592.16,-1252.86 1639.41,-1041.24
  rectangle net VBAT: 1162.28,-1245.19 1207.28,-1145.26
  rectangle net BATT: 1592.16,-1502.22 2013.82,-1379.24
  rectangle net GND: 1467.28,-561.05 1495.28,-525.05
  rectangle net NetLED1_2: 1838.37,-939.73 1927.08,-898.82
  rectangle net NetLED2_2: 1838.37,-886.28 1927.08,-845.36
  rectangle net ENABLE: 933.28,-216.05 981.28,-142.05
  rectangle net BATT: 1000.28,-1499.05 1121.22,-1186.05
  region net GND: 1522.62,-601.76 1522.62,-551.76 1442.28,-551.76 1442.28,-601.76
  region net GND: 1673.28,-602.05 1673.28,-552.05 1466.28,-552.05 1466.28,-602.05
  region net NetC102_2: 1721.03,-525.05 1721.03,-476.05 1561.28,-476.05 1561.28,-525.05
  rectangle net NetC102_2: 1573.28,-525.05 1639.28,-438.05
Bottom Layer:
  rectangle net NetQ6_3: 530.86,-1282.54 597.07,-1238.03
  region net 3.3V: 2197.79,-637 2197.79,-596 1823.28,-596 1823.28,-637
  rectangle net 5V_BOOST: 1261.05,-1606 1390,-1510.79
  rectangle net 5V_BOOST: 1261.05,-1553.05 1724.39,-1510.79
  region net GND: 2101.26,-1254.32 2027.09,-1368.52 2189.64,-1474.08 2263.81,-1359.88
  region net BATT: 2017.65,-1381.14 1949.25,-1486.47 2112.1,-1592.23 2180.5,-1486.9
  rectangle net GND: 1227.02,-1918.73 1286.01,-1813.18
  rectangle net VUSB: 1155.49,-1819.98 1214.48,-1772.43
  rectangle net VUSB: 1141.78,-1807.05 1264.66,-1774.05
  rectangle net NetJ2_A5: 1092.78,-1812.51 1130.24,-1775.05
  rectangle net VUSB: 1141.78,-1807.05 1252.3,-1765.3
  rectangle net GND: 1092.78,-1744.05 1176.78,-1713.05
  rectangle net GND: 498.37,-847.17 570.19,-775.35
  rectangle net BATT: 703.72,-1637.26 739,-1460.05
  rectangle net BATT: 607.38,-1637.26 739,-1607.26
  rectangle net GND: 556.38,-1595.68 694.2,-1547.26
  rectangle net BATT: 1000.28,-1501.06 1046.28,-1436.41
  rectangle net BATT: 703.72,-1501.06 1046.28,-1460.05
  rectangle net NetQ2_1: 841.6,-1230.33 871.6,-1156.69
  rectangle net VBAT: 1162.28,-1295.05 1207.28,-1208.05
  rectangle net VBAT: 884.33,-1295.05 1207.28,-1261.83
  rectangle net VBAT: 884.33,-1391.8 917.28,-1262.05
  rectangle net VBAT: 782.47,-1391.58 917.28,-1353.11
  rectangle net NetQ1_1: 782.47,-1323.11 819.28,-1226.05
  rectangle net NetQ1_1: 782.47,-1323.11 871.3,-1284.49
  rectangle net BAT_ADC: 532.8,-1415.94 625.78,-1331.78
  rectangle net NetC82_2: 749.32,-1727.82 788.69,-1646.86
  rectangle net NetC84_2: 511.28,-1676.08 694.2,-1644.76
  rectangle net NetC84_2: 506.16,-1732.76 591.38,-1644.76
  rectangle net 5V: 1084.28,-1503.19 1387.28,-1393.81
  rectangle net 5V: 1084.28,-1698.05 1252.29,-1402.44
  rectangle net GND: 1237.83,-1915.86 1275.84,-1833.3
  rectangle net GND: 1202.67,-1880.54 1278.26,-1833.3
  rectangle net GND: 900.31,-1911.25 934.28,-1833.3
  rectangle net GND: 900.31,-1880.54 974.33,-1833.3
  rectangle net 5V: 1499.92,-1217.05 1625.14,-1110.75
  rectangle net V_MON: 653.68,-1375.44 739.95,-1316.78
  rectangle net 5V: 1285.28,-1217.05 1608.28,-1157.05
  rectangle net 5V: 1285.28,-1503.19 1387.28,-1157.05
  rectangle net NetF1_2: 1304.26,-1780.51 1390,-1630.22
  rectangle net 5V: 1083.28,-1666.87 1252.29,-1517.05
  rectangle net VUSB: 1225.29,-1805.77 1264.66,-1713.58
  rectangle net VUSB: 909.28,-1823.34 1005.82,-1773.05
  rectangle net VUSB: 982.2,-1880.54 1005.82,-1798.05
  rectangle net VUSB: 1171.18,-1880.54 1194.8,-1775.05
  rectangle net GND: 1545.28,-421.05 1598.28,-368.05

## Silkscreen, mask and mechanical layers (free items; w line width, h text height)
Top Overlay:
  lines w10: 414.5,-1217.55 423.55,-1217.55 433,-1227 433,-1384 423.55,-1393.45 ; 576.18,-1650.75 602.18,-1650.94 602.18,-1620.38 ; 652.87,-1617.22 660.05,-1602.86 ; 685.27,-1504.15 701.01,-1519.89 ; 1156.93,-890.61 1157.1,-876.72 ; 1946.69,-1287.71 1959.41,-1267.37
  text "VOL-" at 1176.36,385.78 h60 r78
  text "MUTE" at 1052.78,385.16 h60 r103
  text "VOL+" at 1652.93,237.59 h60 r52.9
  text "ON/OFF" at 302.08,-14.97 h60 r128
  text "5V_Boost" at 1184.98,-21.05 h60
  text "3V3" at 1466.33,-155.05 h60
  text "PROGRAM." at 2223.54,-856.07 h60 r90
  text "CHARGING" at 1474.74,-890.45 h60
  text "STANDBY" at 1474.74,-944.45 h60
  text "BUTTON4" at 2136.79,-1205.29 h60 r73
  text "-VE" at 2216.03,-1286.84 h40 r147
  text "BATT" at 1068.26,-1487.05 h60
  text "BATTERY" at 1893.8,-1516.62 h65 r57
  text "GND" at 1069.28,-1575.05 h60
  text "+VE" at 2052.78,-1574.48 h40 r147
  text "RESET" at 536.91,-1755.84 h55 r335
Bottom Overlay:
  drawing of 3090 lines, arcs and shapes, not listed
  text "ZERO CARBON FOOTPRINT" at 1509.4,-625.05 h38
  text "USB" at 1282.35,-2070.05 h60 r270
Dimension:
  lines w10: -403.72,-765.05 2589.34,-765.05 ; 29.64,-1529.99 188.63,-1530.12 190.34,15.6 40.81,15.6 cw(c1092.99,-764.8) 29.64,-1529.9 ; 1092.99,-764.8 1667.99,-2148.57 ; 1093.28,-2099.85 1093.28,569.48 ; 2174.28,-1846.05 1093.28,-765.05 2174.28,315.95
Board Outline:
  drawing of 8859 lines, arcs and shapes, not listed
Fabrication:
  drawing of 191 lines, arcs and shapes, not listed
  text "Layer" at 3321.58,737 h60
  text "Name" at 3731.49,737 h60
  text "Material" at 4661.23,737 h60
  text "Thickness" at 5521,737 h60
  text "Constant" at 6170.84,737 h60
  text "Board Layer Stack" at 6740.7,737 h60
  text "Top Overlay" at 3731.49,617 h60
  text "Top Solder" at 3731.49,497 h60
  text "Solder Resist" at 4661.23,497 h60
  text "3.00mil" at 5521,497 h60
  text "3.5" at 6170.84,497 h60
  text "1" at 3321.58,377 h60
  text "Top Layer" at 3731.49,377 h60
  text "10.00mil" at 5521,377 h60
  text "Dielectric 1" at 3731.49,257 h60
  text "FR-4" at 4661.23,257 h60
  text "37.00mil" at 5521,257 h60
  text "4.8" at 6170.84,257 h60
  text "2" at 3321.58,137 h60
  text "Bottom Layer" at 3731.49,137 h60
  text "10.00mil" at 5521,137 h60
  text "Bottom Solder" at 3731.49,17 h60
  text "Solder Resist" at 4661.23,17 h60
  text "3.00mil" at 5521,17 h60
  text "3.5" at 6170.84,17 h60
  text "Bottom Overlay" at 3731.49,-103 h60
  text "Total board thickness:" at 3321.58,-223 h60
  text "63.00mil" at 5521,-223 h60
Drill Drawing:
  circle w10: c-50.38,2198.28 r20
  circle w10: c-50.38,2198.28 r33.33
  lines w10: -83.71,1564.94 -50.38,1581.61 -17.04,1564.94 -33.71,1598.28 -17.04,1631.61 -50.38,1614.94 -83.71,1631.61 -67.04,1598.28 -83.71,1564.94 ; -83.71,1781.61 -17.04,1781.61 -50.38,1714.94 -83.71,1781.61 ; -83.71,1864.94 -17.04,1864.94 -17.04,1931.61 -83.71,1931.61 -83.71,1864.94 ; -83.71,2048.28 -50.38,2014.94 -17.04,2048.28 -50.38,2081.61 -83.71,2048.28 ; -83.71,2381.61 -17.04,2381.61 -50.38,2314.94 -83.71,2381.61 ; -83.71,2481.61 -67.04,2481.61 -50.38,2464.94 -33.71,2481.61 -17.04,2481.61 -33.71,2498.28 -17.04,2514.94 -33.71,2514.94 -50.38,2531.61 -67.04,2514.94 -83.71,2514.94 -67.04,2498.28 -83.71,2481.61 ; -70.38,2368.28 -30.38,2368.28 -50.38,2328.28 -70.38,2368.28 ; -70.38,2488.28 -60.38,2488.28 -50.38,2478.28 -40.38,2488.28 -30.38,2488.28 -40.38,2498.28 -30.38,2508.28 -40.38,2508.28 -50.38,2518.28 -60.38,2508.28 -70.38,2508.28 -60.38,2498.28 -70.38,2488.28
  lines w15: -143.5,1519.94 13324.7,1519.94 ; -143.5,2569.94 13324.7,2569.94 ; 407.38,1369.94 407.38,2719.94 ; 997.22,1369.94 997.22,2719.94 ; 2096.9,1369.94 2096.9,2719.94 ; 2602.78,1369.94 2602.78,2719.94 ; 3336.58,1369.94 3336.58,2719.94 ; 4836.13,1369.94 4836.13,2719.94 ; 5425.98,1369.94 5425.98,2719.94 ; 6171.78,1369.94 6171.78,2719.94 ; 7311.44,1369.94 7311.44,2719.94 ; 8165.21,1369.94 8165.21,2719.94 ; 9498.81,1369.94 9498.81,2719.94 ; 10832.42,1369.94 10832.42,2719.94 ; 11922.1,1369.94 11922.1,2719.94 ; -143.5,1369.94 13324.7,1369.94 13324.7,2719.94 -143.5,2719.94 -143.5,1369.94
  text "Symbol" at -53.5,2614.94 h72
  text "Count" at 452.38,2614.94 h72
  text "Hole Size" at 1042.22,2614.94 h72
  text "Plated" at 2141.9,2614.94 h72
  text "Hole Type" at 2647.78,2614.94 h72
  text "Drill Layer Pair" at 3381.58,2614.94 h72
  text "Via/Pad" at 4881.13,2614.94 h72
  text "Pad Shape" at 5470.98,2614.94 h72
  text "Template" at 6216.78,2614.94 h72
  text "Description" at 7356.44,2614.94 h72
  text "Hole Tolerance (+)" at 8210.21,2614.94 h72
  text "Hole Tolerance (-)" at 9543.81,2614.94 h72
  text "Hole Length" at 10877.42,2614.94 h72
  text "Routed Path Length" at 11967.1,2614.94 h72
  text "2" at 452.38,2464.94 h60
  text "23.62mil (0.600mm)" at 1042.22,2464.94 h60
  text "PTH" at 2141.9,2464.94 h60
  text "Slot" at 2647.78,2464.94 h60
  text "Top Layer - Bottom Layer" at 3381.58,2464.94 h60
  text "Pad" at 4881.13,2464.94 h60
  text "Rounded" at 5470.98,2464.94 h60
  text "r90_170h60_140r100" at 6216.78,2464.94 h60
  text "55.12mil (1.400mm)" at 10877.42,2464.94 h60
  text "31.50mil (0.800mm)" at 11967.1,2464.94 h60
  text "2" at 452.38,2314.94 h60
  text "23.62mil (0.600mm)" at 1042.22,2314.94 h60
  text "PTH" at 2141.9,2314.94 h60
  text "Slot" at 2647.78,2314.94 h60
  text "Top Layer - Bottom Layer" at 3381.58,2314.94 h60
  text "Pad" at 4881.13,2314.94 h60
  text "Rounded" at 5470.98,2314.94 h60
  text "(Mixed)" at 6216.78,2314.94 h60
  text "66.93mil (1.700mm)" at 10877.42,2314.94 h60
  text "43.31mil (1.100mm)" at 11967.1,2314.94 h60
  text "2" at 452.38,2164.94 h60
  text "24.41mil (0.620mm)" at 1042.22,2164.94 h60
  text "NPTH" at 2141.9,2164.94 h60
  text "Round" at 2647.78,2164.94 h60
  text "Top Layer - Bottom Layer" at 3381.58,2164.94 h60
  text "Pad" at 4881.13,2164.94 h60
  text "Rounded" at 5470.98,2164.94 h60
  text "c0hn62" at 6216.78,2164.94 h60
  text "-" at 10877.42,2164.94 h60
  text "-" at 11967.1,2164.94 h60
  text "2" at 452.38,2014.94 h60
  text "35.43mil (0.900mm)" at 1042.22,2014.94 h60
  text "PTH" at 2141.9,2014.94 h60
  text "Round" at 2647.78,2014.94 h60
  text "Top Layer - Bottom Layer" at 3381.58,2014.94 h60
  text "Pad" at 4881.13,2014.94 h60
  text "(Mixed)" at 5470.98,2014.94 h60
  text "(Mixed)" at 6216.78,2014.94 h60
  text "-" at 10877.42,2014.94 h60
  text "-" at 11967.1,2014.94 h60
  text "3" at 452.38,1864.94 h60
  text "82.68mil (2.100mm)" at 1042.22,1864.94 h60
  text "NPTH" at 2141.9,1864.94 h60
  text "Round" at 2647.78,1864.94 h60
  text "Top Layer - Bottom Layer" at 3381.58,1864.94 h60
  text "Pad" at 4881.13,1864.94 h60
  text "Rounded" at 5470.98,1864.94 h60
  text "c260hn210m265" at 6216.78,1864.94 h60
  text "-" at 10877.42,1864.94 h60
  text "-" at 11967.1,1864.94 h60
  text "26" at 452.38,1714.94 h60
  text "39.37mil (1.000mm)" at 1042.22,1714.94 h60
  text "PTH" at 2141.9,1714.94 h60
  text "Round" at 2647.78,1714.94 h60
  text "Top Layer - Bottom Layer" at 3381.58,1714.94 h60
  text "Pad" at 4881.13,1714.94 h60
  text "(Mixed)" at 5470.98,1714.94 h60
  text "(Mixed)" at 6216.78,1714.94 h60
  text "-" at 10877.42,1714.94 h60
  text "-" at 11967.1,1714.94 h60
  text "160" at 452.38,1564.94 h60
  text "11.81mil (0.300mm)" at 1042.22,1564.94 h60
  text "PTH" at 2141.9,1564.94 h60
  text "Round" at 2647.78,1564.94 h60
  text "Top Layer - Bottom Layer" at 3381.58,1564.94 h60
  text "(Mixed)" at 4881.13,1564.94 h60
  text "Rounded" at 5470.98,1564.94 h60
  text "(Mixed)" at 6216.78,1564.94 h60
  text "-" at 10877.42,1564.94 h60
  text "-" at 11967.1,1564.94 h60
  text "197 Total" at 452.38,1414.94 h60
  text "Slot definitions :" at -53.5,1269.97 h60
  text "Routed Path Length" at 979.19,1269.97 h60
  text "= Calculated from tool start centre position to tool end centre position." at 2081.86,1269.97 h60
  text "Hole Length" at 979.19,1169.99 h60
  text "= Routed Path Length + Tool Size = Slot length as defined in the PCB layout" at 1671.99,1169.99 h60

## Dimensions
179.17,0.65 to 179.33,-1512.39 on Dimension
179.17,0.65 to 2.05,1.68 on Dimension
1093.4,-764.92 to 2740.01,-764.92 on Dimension
1093.28,569.48 to 1093.4,-2099.49 on Dimension

## Text inside footprints (layer, text, board x,y; h text height)
J2: Bottom Overlay "Board Edge" at 1223.48,-2039.59 h28
SW4: Top Overlay "PCB Edge" at 1814.27,314.19 h39.37 r322.9
SW5: Top Overlay "PCB Edge" at 731.3,479.8 h39.37 r13
SW6: Top Overlay "PCB Edge" at 1290.87,517.18 h39.37 r348
SW8: Top Overlay "PCB Edge" at 239.95,209.45 h39.37 r38